# EAGLE board grove_ssd1315_v1.0 (EAGLE 9.4.2)
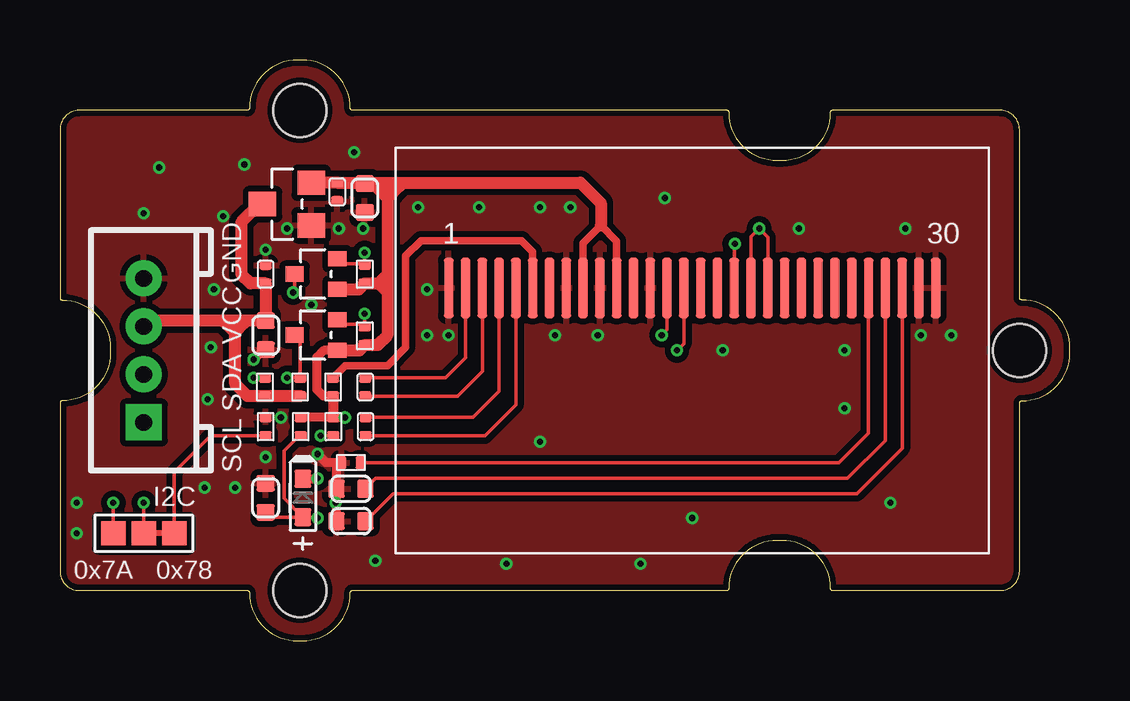
[diagram p0: board, top side]
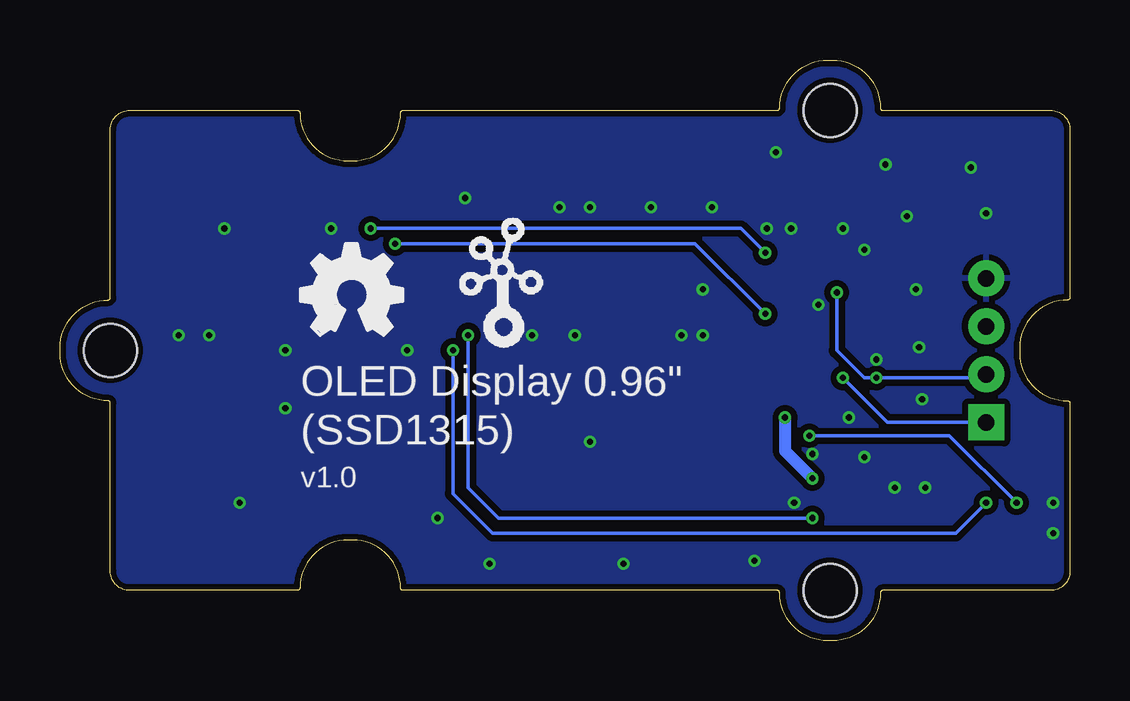
[diagram p1: board, bottom side, seen from below]

Size 42.1 x 24.2 mm. Coordinates in mm from the lower left corner, seen from the top.
Copper layers (1*16): Top 0.035mm / dielectric 1.5mm / Bottom 0.035mm
Design rules "SeeedStudio_2layer_DRU_no_angle_20140221": minimum track width 1mil, minimum drill 10mil, track to track 6mil, track to pad 6mil, pad to pad 6mil, via to via 6mil, smd to smd 0mil, copper to edge 10mil, drill to drill 10mil, minimum pad ring 4mil, minimum via ring 4mil, stop-mask expansion 2mil, vias tented up to drill 25mil, thermal gap 10mil
Net classes: 0 default: width 0.152 mm, drill 0.254 mm, clearance 0.152 mm; 1 power: width 0.152 mm, drill 0.254 mm, clearance 0.152 mm; 2 gnd: width 0.152 mm, drill 0.254 mm, clearance 0.152 mm; 3 usbvcc: width 0.152 mm, drill 0.254 mm, clearance 0.152 mm
bRestrict: area 36.4,-10.9 to 36.8,-10.6; area 27.4,-15 to 27.8,-14.4; area 25,-15 to 26,-14.4; area 18.9,-15 to 21.2,-14.4; area 14.2,-11 to 14.6,-10.5

## Footprints (pad centres in the part's own frame; a part is rotated, then mirrored left to right if it is on the bottom)
C0603 = smd 0.696 x 0.762: 1 0.602,0; 2 -0.602,0
C0402 = smd 0.385 x 0.508: 1 0.383,0; 2 -0.383,0
SOD-523 = smd 0.762 x 0.7: + 0.8,0; - -0.8,0
HW4-2.0 = drill 0.7 pad 1.5 square: 1 -3,0 | drill 0.7 pad 1.5: 2 -1,0; 3 1,0; 4 3,0
3P-SMD-SHORT = smd 1.016 x 1.016: 00 -1.27,0; 11 1.27,0; MM 0,0
SOT-323 = smd 0.762 x 0.635: 1 0.889,-0.635; 2 0.889,0.635; 3 -0.889,0
R0402 = smd 0.385 x 0.508: 1 0.383,0; 2 -0.383,0
SOT-23 = smd 1.016 x 1.143: 1 -0.889,-1.016; 2 0.889,-1.016; 3 0,1.016
OLED30P-0.7-24.74X16.9MM = smd 0.4 x 2.5: 1 -10.15,2.604; 2 -9.45,2.604; 3 -8.75,2.604; 4 -8.05,2.604; 5 -7.35,2.604; 6 -6.65,2.604; 7 -5.95,2.604; 8 -5.25,2.604; 9 -4.55,2.604; 10 -3.85,2.604; 11 -3.15,2.604; 12 -2.45,2.604; 13 -1.75,2.604; 14 -1.05,2.604; 15 -0.35,2.604; 16 0.35,2.604; 17 1.05,2.604; 18 1.75,2.604; 19 2.45,2.604; 20 3.15,2.604; 21 3.85,2.604; 22 4.55,2.604; 23 5.25,2.604; 24 5.95,2.604; 25 6.65,2.604; 26 7.35,2.604; 27 8.05,2.604; 28 8.75,2.604; 29 9.45,2.604; 30 10.15,2.604
2U-DIM-W/DRILL = hole 2.2: -10,-10; -10,10; 20,0

## Placement (x,y rotation side)
C1  10uF/10V  [C0603]  8.58,12.73 90 top
C2  10uF/10V  [C0603]  12.71,18.45 90 top
C3  1uF  [C0402]  12.73,10.58 270 top
C4  1uF  [C0402]  12.74,8.93 270 top
C5  10uF  [C0603]  8.57,5.95 270 top
C6  4.7uF/10V  [C0603]  12.13,6.33 180 top
C7  2.2uF/10V  [C0603]  12.13,4.99 180 top
C8  100nF  [C0402]  8.57,15.27 90 top
C9  100nF  [C0402]  11.56,18.7 270 top
D1  1N4148WT  [SOD-523]  10.12,5.95 270 top
FR1  SEEEDSTUDIO-OPEN-SCH-FRAME  [SEEEDSTUDIO-PCB-FRAME]  -12.51,-20.54 0 top  (outside the outline)
FR2  SEEEDSTUDIO-OPEN-SCH-FRAME  [SEEEDSTUDIO-PCB-FRAME]  -13.02,-27.14 0 top  (outside the outline)
J1  [HW4-2.0]  3.49,12.1 90 top
JP1  [3P-SMD-SHORT]  3.49,4.48 0 top
LOGO1  LOGO-OSHW-FILLX0150-NT  [OSHW_FILLX150_NOTEXT]  32.07,12.73 0 bottom
Q3  CJ2102  [SOT-323]  10.67,15.28 0 top
Q4  CJ2102  [SOT-323]  10.67,12.74 0 top
R1  4.7k  [R0402]  12.71,15.27 270 top
R2  4.7k  [R0402]  12.71,12.71 90 top
R3  4.7k  [R0402]  8.54,10.58 90 top
R4  4.7k  [R0402]  10.01,10.58 90 top
R5  4.7k  [R0402]  10.04,8.93 270 top
R6  0R  [R0402]  11.38,10.58 270 top
R7  4.7k  [R0402]  8.57,8.93 90 top
R8  620k  [R0402]  12.13,7.43 0 top
R9  4.7k  [R0402]  11.39,8.93 90 top
U1  XC6206P332MR  [SOT-23]  9.46,18.2 90 top
U4  [OLED30P-0.7-24.74X16.9MM]  26.35,12.1 0 top
U5  [2U-DIM-W/DRILL]  20,12.1 0 top
U$1  LOGO-GROVETWIGLOGO_SMALL  [GROVE-SILK-SMALL]  25.85,12.1 0 bottom

## Library data of the parts
C1-C9 R1-R9 = Discrete-small
D1 JP1 Q3 Q4 = Discrete-new
FR1 FR2 U4 = moudle-new
J1 = Connector-new
LOGO1 U$1 = logo; PARTNO: DNP
U1 = IC-new
U5 = moudle

## Nets
3V3: C2.1 C9.2 D1.- Q3.1 Q4.1 R1.1 R2.2 R5.2 R6.1 R9.1 U1.2 U4.9 U4.11
GND: C1.2 C2.2 C5.2 C6.1 C7.1 C8.1 C9.1 J1.4 R7.1 R8.2 U1.1 U4.1 U4.8 U4.10 U4.13 U4.29 U4.30
HSCL: J1.1 Q4.3 R4.1
HSDA: J1.2 Q3.3 R3.1
IIC_ADDR: JP1.MM U4.15
N$1: C3.2 U4.2
N$2: C4.2 U4.4
N$3: C3.1 U4.3
N$4: C4.1 U4.5
N$5: R8.1 U4.26
N$6: C6.2 U4.27
N$7: C7.2 U4.28
N$8: R6.2 U4.6
N$10: JP1.11 R7.2
N$11: JP1.00 R9.2
RES: C5.1 D1.+ R5.1 U4.14
SCL: Q4.2 R2.1 U4.18
SDA: Q3.2 R1.2 U4.19 U4.20
VCC_IN: C1.1 C8.2 J1.3 R3.2 R4.2 U1.3

## Tracks (layer width: path | path; a pad name or v marks a point on that pad's centre or on a via)
3V3  (via drill 0.25 pad 0.51)
  Top 0.152: 12.67,19.09 13.53,19.09 13.65,18.96
  Top 0.305: U4.9 21.8,16.57 22.54,17.31 23.2,16.65 U4.11
  Top 0.381: v11.88,9.31 11.75,9.31 R9.1 R5.2 | D1.- 10.72,6.75 v10.73,6.77 | R6.1 10.98,10.19 10.71,10.47 10.71,11.82 10.99,12.1 Q4.1
  Top 0.406: R6.1 11.38,9.32 R9.1
  Top 0.508: Q3.1 12.46,14.64 R1.1 12.99,14.89 13.27,14.89 | Q4.1 12.48,12.1 R2.2 13.25,12.33 13.65,12.73 13.65,14.51 | U1.2 C9.2 12.67,19.09 | 12.67,19.09 C2.1 | 12.67,19.09 21.69,19.09 22.54,18.23 22.54,17.31 | 13.65,18.96 13.65,18.45 | 13.65,18.45 13.65,15.27 | 13.65,15.27 13.65,15.02 | 13.65,15.02 13.65,14.51 | 13.27,14.89 13.53,14.89 13.65,15.02 | 13.65,18.45 13.02,19.09 | 13.65,18.45 14.16,18.96 | 13.27,14.89 13.65,15.27 | 13.27,14.89 13.28,14.89 13.65,14.51
  Bottom 0.508: v11.88,9.31 11.88,7.91 v10.73,6.77
GND  (via drill 0.25 pad 0.51)
  Top 0.381: R8.2 11.09,7.43 v10.73,7.78 | C1.2 8.48,12.13 v8.07,11.72 | C7.1 11.53,7.37 11.5,7.4
  Top 0.508: C6.1 11.53,6.43
  other vias: 3.49,17.81 0.7,4.48 4.13,19.72 7.69,19.85 6.8,17.69 6.42,14.64 6.29,12.23 6.16,10.07 6.03,6.38 15.31,14.64 25.21,18.45 13.15,3.34 18.61,3.21 24.2,3.21 26.35,5.11 9.21,9.31 8.57,7.65 11.5,5.75 8.57,16.29 11.62,17.18 12.64,17.18 0.7,5.75 12.26,20.36 9.46,17.18 7.3,6.38 16.19,12.73 15.31,12.73 21.27,18.07 20,18.07 20.64,12.73 22.42,12.73 35.88,12.73 37.15,12.73 27.62,12.1 32.7,12.1 20,8.29 34.61,5.75 32.7,9.69 30.8,17.18 35.24,17.18 14.92,18.07 17.46,18.07 10.48,14
  pour Bottom (isolate 0.254): -0.32,24.16 42.23,24.16 42.23,1.94 42.23,0.04 -0.32,0.04
  pour Top (isolate 0.254): -0.32,24.16 42.23,24.16 42.23,1.94 42.23,0.04 -0.32,0.04
HSCL  (via drill 0.25 pad 0.51)
  Top 0.152: v9.46,10.96 v9.47,10.96 R4.1 10.01,12.51 Q4.3
  Bottom 0.152: J1.1 7.61,9.1 v9.46,10.96
HSDA  (via drill 0.25 pad 0.51)
  Top 0.152: R3.1 v8.07,10.96 | Q3.3 9.78,14.58 v9.72,14.51
  Bottom 0.152: v9.72,14.51 9.72,12.1 8.57,10.96 v8.07,10.96 3.19,10.96 J1.2
IIC_ADDR  (via drill 0.25 pad 0.51)
  Top 0.152: JP1.MM v3.49,5.75 | U4.15 26,12.38 v25.72,12.1
  Bottom 0.152: v3.49,5.75 4.76,4.48 24.07,4.48 25.72,6.13 v25.72,12.1
N$1
  Top 0.152: C3.2 16.07,10.96 16.9,11.79 U4.2
N$2
  Top 0.152: C4.2 17.21,9.31 18.3,10.4 U4.4
N$3
  Top 0.152: C3.1 16.57,10.19 17.6,11.22 U4.3
N$4
  Top 0.152: C4.1 17.72,8.54 18.61,9.43 18.73,9.56 19,9.83 U4.5
N$5
  Top 0.152: R8.1 32.48,7.43 32.7,7.65 33.34,8.29 33.7,8.65 U4.26
N$6
  Top 0.152: U4.27 34.4,8.34 32.83,6.77 13.16,6.77 C6.2
N$7
  Top 0.152: U4.28 35.1,8.02 33.21,6.13 13.88,6.13 C7.2
N$8
  Top 0.305: R6.2 11.89,11.46 13.65,11.46 14.42,12.23 14.42,16.04 15.05,16.67 19.24,16.67 19.7,16.21 U4.6
N$10
  Top 0.152: R7.2 6.29,8.54 4.76,7.02 JP1.11
N$11  (via drill 0.25 pad 0.51)
  Top 0.152: R9.2 v10.86,8.54 | JP1.00 v2.22,5.75
  Bottom 0.152: v10.86,8.54 5.02,8.54 v2.22,5.75
RES  (via drill 0.25 pad 0.51)
  Top 0.152: D1.+ 10.7,5.15 v10.73,5.11 | D1.+ 8.77,5.15 C5.1 | U4.14 25.3,12.96 v25.08,12.73 | R5.1 9.97,8.54 9.34,7.91 9.34,5.94 D1.+
  Bottom 0.152: v25.08,12.73 25.08,6.38 23.81,5.11 v10.73,5.11
SCL  (via drill 0.25 pad 0.51)
  Top 0.152: U4.18 28.1,16.52 v28.13,16.55 | v12.7,13.62 12.7,13.18 | 12.7,13.18 R2.1 12.66,13.09 12.64,13.12 12.7,13.18 | 12.7,13.18 11.75,13.18 Q4.2
  Bottom 0.152: v28.13,16.55 15.62,16.55 v12.7,13.62
SDA  (via drill 0.25 pad 0.51)
  Top 0.152: v12.7,16.16 12.71,16.1 R1.2 12.64,15.72 11.75,15.72 Q3.2 | U4.19 28.8,16.84 v29.15,17.18 29.5,16.82 U4.20
  Bottom 0.152: v29.15,17.18 13.72,17.18 v12.7,16.16
VCC_IN
  Top 0.152: 7.3,12.86 7.27,12.86 7.16,12.97
  Top 0.508: U1.3 8.32,18.2 7.56,17.43 7.56,15.27 7.94,14.89 C8.2 C1.1 6.8,13.34 | R4.2 R3.2 7.81,10.19 7.3,10.7 7.3,12.83 | 7.3,12.83 7.3,12.86 | 7.3,12.86 7.3,13.24 | 6.8,13.34 3.73,13.34 J1.3 | 7.3,12.83 7.16,12.97 6.8,13.34 | 7.3,12.73 7.3,12.83 | 7.3,12.86 7.69,13.24

## Text on the board
tPlace: GND | VCC | SDA | SCL | I2C | 0x7A | 0x78
bPlace: OLED Display 0.96" | (SSD1315) | v1.0